# Altium PCB nexnclock_one_mainboard_rev_2_0.PcbDoc
Units mm, origin at the board's own origin, x right, y up, seen from the top; angles counter-clockwise.
Board outline 100 x 35 mm, 2 copper layers (Top Layer, Bottom Layer), stack 1.571 mm thick; 122 components, 112 nets, 401 pads, 144 vias.
Unrouted connection lines stored in the file: 125.
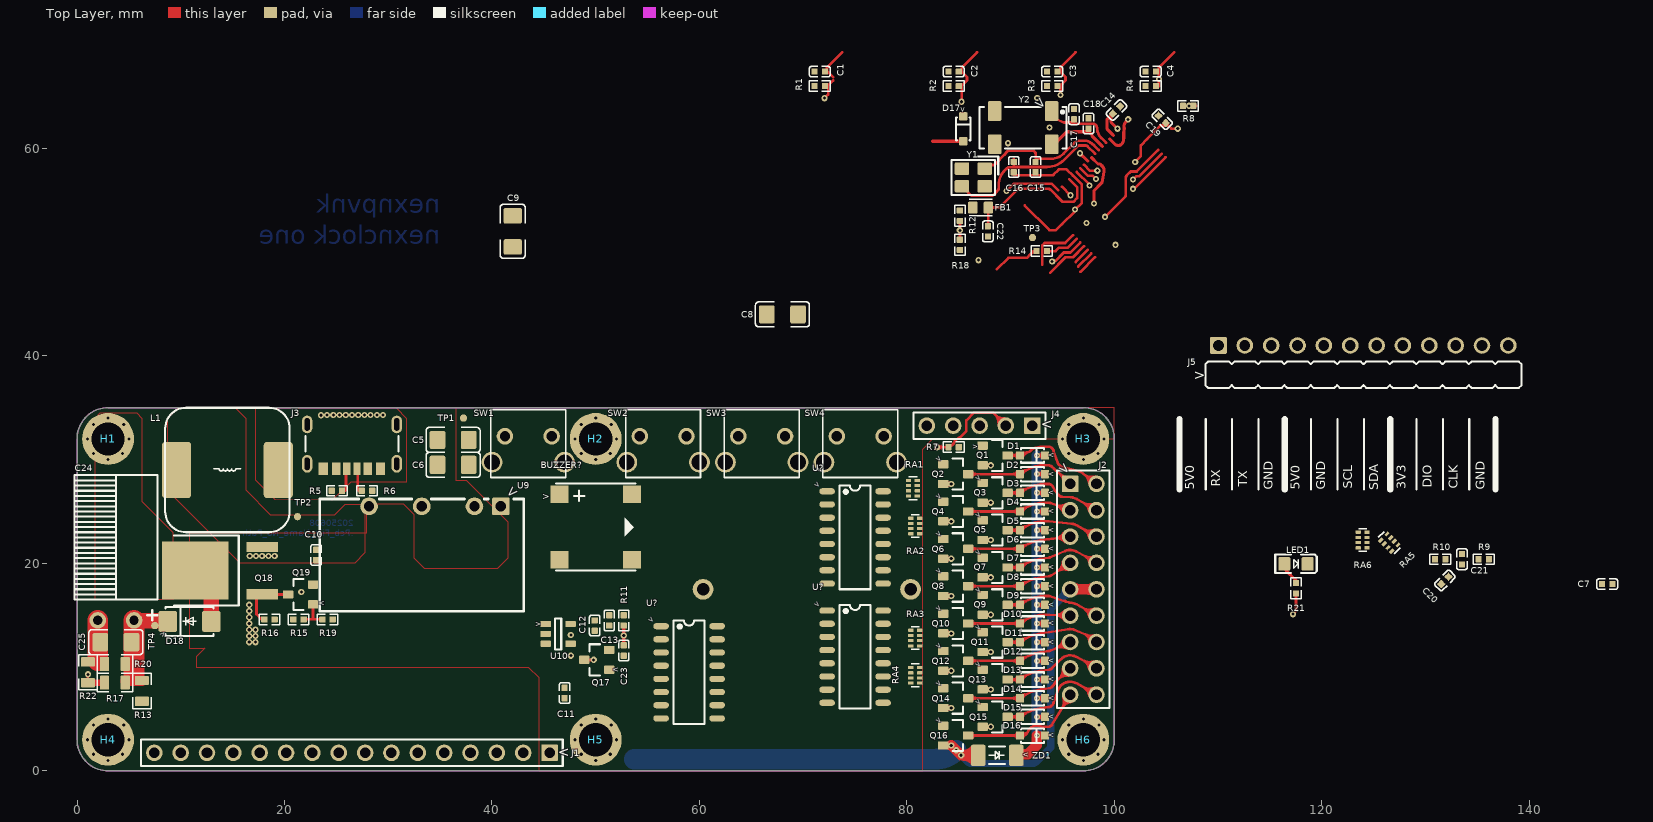
[diagram p0: Top Layer view]
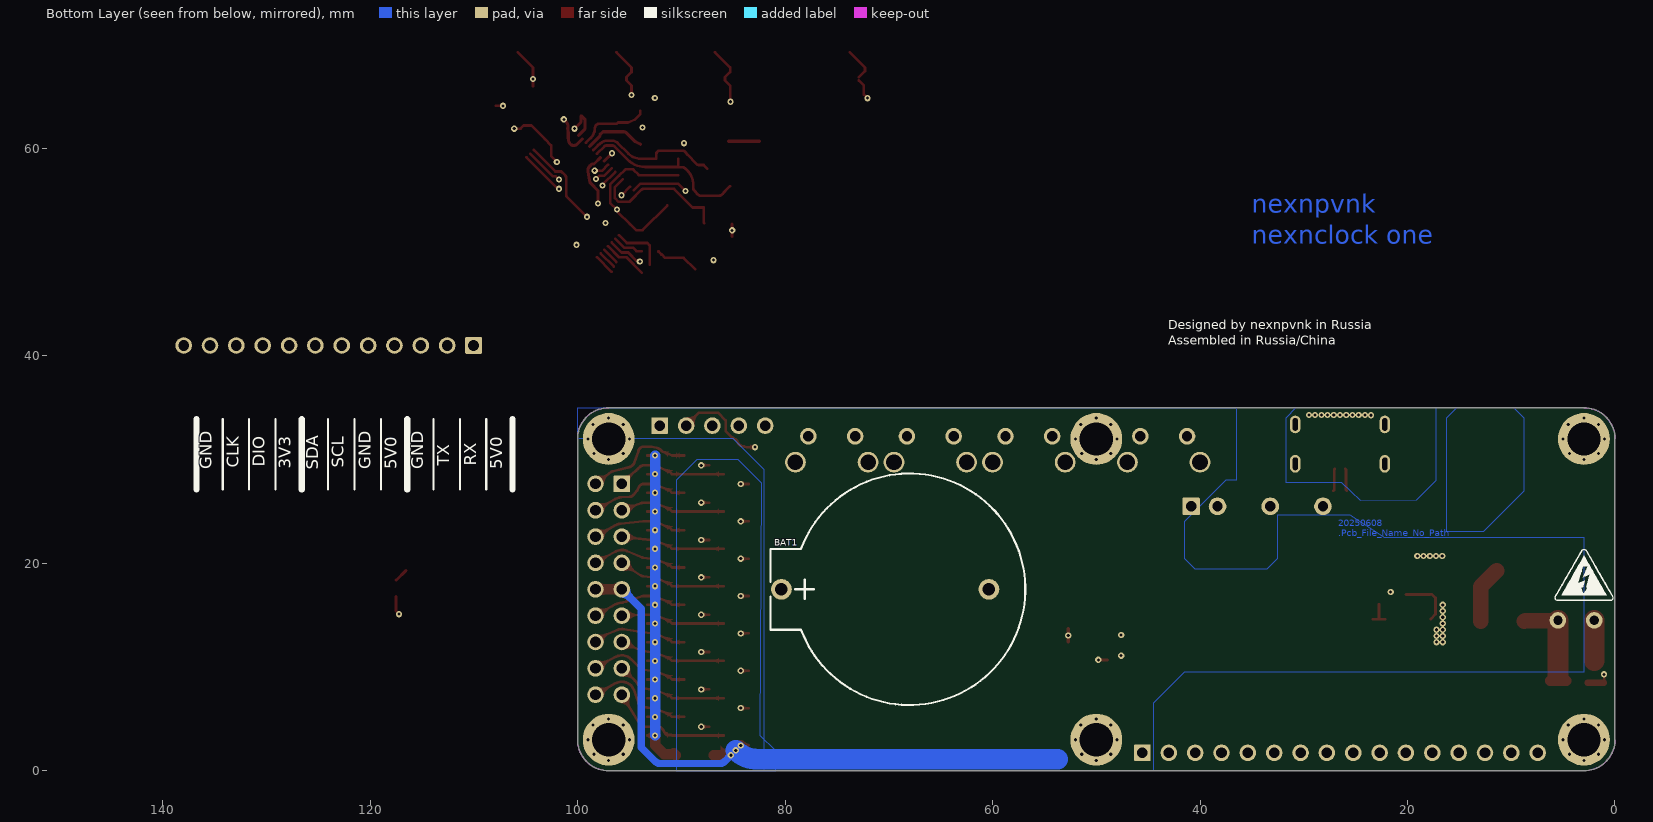
[diagram p1: Bottom Layer view, seen from below]

## Layer stack, top to bottom
Top Solder: solder mask 0.0102, Solder Resist, Dk 3.5
Top Layer: signal copper 0.0356
Dielectric 1: dielectric 1.5, FR-4, Dk 4.8
Bottom Layer: signal copper 0.0356
Bottom Solder: solder mask 0.0102, Solder Resist, Dk 3.5

## Board outline
0,3 0,32 cw(c3,32) 3,35 97,35 cw(c97,32) 100,32 100,3 cw(c97,3) 97,0 3,0 cw(c3,3)

## Design rules (kind name [scope] priority, off if disabled: settings)
Clearance [All] p1: gap=0.2 ignorepadtopadclearanceinfootprint=TRUE except(0: Arc-Text Track-Text SMDPad-Text THPad-Text Via-Text Fill-Text Poly-Text Region-Text Text-Text; 0.127: THPad-THPad; 0.3: Arc-THPad Track-THPad SMDPad-THPad)
ComponentClearance ComponentClearance_1 [(Footprint = 'B_S-2WR2_FLAT')] p1: gap=-5 collisioncheckmode=3 verticalgap=-5 showdistances=FALSE
ComponentClearance [All] p2: gap=0 collisioncheckmode=3 verticalgap=0 showdistances=FALSE
DiffPairsRouting [All] p1: maxlimit=1 minlimit=0.127 mostfreqgap=0.3 toplayer_minwidth=0.127 toplayer_maxwidth=0.381 toplayer_prefwidth=0.3 bottomlayer_minwidth=0.127 bottomlayer_maxwidth=0.381 bottomlayer_prefwidth=0.3 maxuncoupledlength=12.7
Height [All] p1: minheight=0 maxheight=100 prefheight=12.7
HoleSize [All] p1: absolutevalues=TRUE maxlimit=5 minlimit=0.025 maxpercent=80.000 minpercent=20.000
HoleToHoleClearance [All] p1: gap=0.127 allowstackedmicrovias=TRUE
MinimumSolderMaskSliver [All] p1: minsoldermaskwidth=0.05
PolygonConnect PolygonConnect_1 [All] p1: thpad.connectstyle=Relief thpad.reliefconductorwidth=0.254 thpad.reliefentries=4 thpad.polygonreliefangle="90 Angle" thpad.airgapwidth=0.2 smdpad.connectstyle=Relief smdpad.reliefconductorwidth=0.254 smdpad.reliefentries=4 smdpad.polygonreliefangle="90 Angle" smdpad.airgapwidth=0.2 via.connectstyle=Direct via.reliefconductorwidth=0.254 via.reliefentries=4 via.polygonreliefangle="90 Angle" via.airgapwidth=0.254
RoutingVias [All] p1: holewidth=0.3 width=0.6 viastyle="Through Hole" minholewidth=0.1 minwidth=0.3 maxholewidth=1 maxwidth=1.27
SilkToSilkClearance [All] p1: silktosilkclearance=0
SilkToSolderMaskClearance [IsPad] p1: minsilkscreentomaskgap=0.127 clearancetoexposedcopper=TRUE
SolderMaskExpansion [All] p1: expansion=0.05 istentingtop=FALSE
SupplyNets "Schematic Supply Nets_6" [InNet('VCC_3V3')] p1: voltage=0.000
SupplyNets "Schematic Supply Nets_5" [InNet('VBUS')] p2: voltage=0.000
SupplyNets "Schematic Supply Nets_4" [InNet('RAW_GND')] p3: voltage=0.000
SupplyNets "Schematic Supply Nets_3" [InNet('VCC_HV')] p4: voltage=0.000
SupplyNets "Schematic Supply Nets_1" [InNet('VCC_5V0')] p5: voltage=0.000
SupplyNets "Schematic Supply Nets" [InNet('GND')] p6: voltage=0.000
Width [All] p1: maxlimit=6 minlimit=0.2 preferedwidth=0.3
22 further rules are at their usual default settings.

## Classes and differential pairs
component class hot_handle_part: D1 D2 D3 D4 D5 D6 D7 D8 D9 D10 D11 D12 D13 D14 D15 D16 J1 J2 Q1 Q2 Q3 Q4 Q5 Q6 Q7 Q8 Q9 Q10 Q11 Q12 Q13 Q14 Q15 Q16 RA1 RA2 RA3 RA4 RA5 RA6 U? ZD1
component class nexnclock_one_mainboard_rev_2_0: BAT1 BUZZER? C1 C2 C3 C4 C5 C6 C7 C8 C9 C10 C11 C12 C13 C14 C15 C16 C17 C18 C19 C20 C21 C22 C23 C24 C25 D17 D18 FB1 H1 H2 H3 H4 H5 H6 J3 J4 J5 L1 LED1 Q17 Q18 Q19 R1 R2 R3 R4 R5 R6 R7 R8 R9 R10 R11 R12 R13 R14 R15 R16 R17 R18 R19 R20 R21 R22 SW1 SW2 SW3 SW4 TP1 TP2 TP3 TP4 U9 U10 Y1 Y2

## Components (designator, comment, footprint, x,y, rotation, side; value= is the part's Value field where it differs from the comment)
BAT1 "BATTERY" CR2032 68,17.5 r0 bottom locked
BUZZER? "BUZZER_SMD" BUZ-SMD_4P-L7.5-W7.5 50,23.5 r0 top
C1 "CAP" C0402 71.6,67.4 r180 top value=100nF
C2 "CAP" C0402 84.5,67.4 r180 top value=100nF
C3 "CAP" C0402 94,67.4 r180 top value=100nF
C4 "CAP" C0402 103.5,67.4 r180 top value=100nF
C5 "CAP" C1206 36.25,31.9 r180 top value=10uF
C6 "CAP" C1206 36.25,29.5 r180 top value=10uF
C7 "CAP" C0402 147.5,18 r180 top value=100nF
C8 "CAP" C1206 68,44 r0 top value=10uF
C9 "CAP" C1206 42,52 r270 top value=10uF
C10 "CAP" C0402 23.05,20.8 r270 top value=100nF
C11 "CAP" C0402 47,7.5 r270 top value=1uF
C12 "CAP" C0402 49.9,14 r270 top value=1uF
C13 "CAP" C0402 51.3,14.5 r270 top value=100nF
C14 "CAP" C0402 100.2,63.7 r45 top value=100nF
C15 "CAP" C0402 92.4,58.2 r270 top value=22pF
C16 "CAP" C0402 90.3,58.2 r270 top value=22pF
C17 "CAP" C0402 96.1,63.3 r90 top value=22pF
C18 "CAP" C0402 97.5,62.4 r90 top value=22pF
C19 "CAP" C0402 104.6,62.8 r315 top value=100nF
C20 "CAP" C0402 131.854,18.354 r225 top value=100nF
C21 "CAP" C0402 133.5,20.4 r90 top value=100nF
C22 "CAP" C0402 87.8,52 r270 top value=100nF
C23 "CAP" C0402 52.7,11.6 r270 top value=100nF
C24 "CAP_POLAR" CAP-TH_D8.0_L12.0_P3.5_RA_FLAT 3.75,14.5 r180 top value=_value
C25 "CAP" C1206 3.75,12.4 r180 top value=100nF
D1 "DIODE" "SOD323 (SC-76A)" 92.1,30.4 r180 top
D2 "DIODE" "SOD323 (SC-76A)" 92.1,28.6 r180 top
D3 "DIODE" "SOD323 (SC-76A)" 92.1,26.8 r180 top
D4 "DIODE" "SOD323 (SC-76A)" 92.1,25 r180 top
D5 "DIODE" "SOD323 (SC-76A)" 92.1,23.2 r180 top
D6 "DIODE" "SOD323 (SC-76A)" 92.1,21.4 r180 top
D7 "DIODE" "SOD323 (SC-76A)" 92.1,19.6 r180 top
D8 "DIODE" "SOD323 (SC-76A)" 92.1,17.8 r180 top
D9 "DIODE" "SOD323 (SC-76A)" 92.1,16 r180 top
D10 "DIODE" "SOD323 (SC-76A)" 92.1,14.2 r180 top
D11 "DIODE" "SOD323 (SC-76A)" 92.1,12.4 r180 top
D12 "DIODE" "SOD323 (SC-76A)" 92.1,10.6 r180 top
D13 "DIODE" "SOD323 (SC-76A)" 92.1,8.8 r180 top
D14 "DIODE" "SOD323 (SC-76A)" 92.1,7 r180 top
D15 "DIODE" "SOD323 (SC-76A)" 92.1,5.2 r180 top
D16 "DIODE" "SOD323 (SC-76A)" 92.1,3.4 r180 top
D17 "DIODE" "SOD323 (SC-76A)" 85.429,61.884 r270 top
D18 "DIODE" "SMA (DO-214AC)" 10.85,14.4 r0 top
FB1 "BEAD" L0603 87.1,54.3 r0 top value=600Ω@100MHz
H1 "MOUNT_HOLE" MOUNT_HOLE_D_3_2_MM 3,32 r0 top
H2 "MOUNT_HOLE" MOUNT_HOLE_D_3_2_MM 50,32 r0 top
H3 "MOUNT_HOLE" MOUNT_HOLE_D_3_2_MM 97,32 r0 top locked
H4 "MOUNT_HOLE" MOUNT_HOLE_D_3_2_MM 3,3 r0 top
H5 "MOUNT_HOLE" MOUNT_HOLE_D_3_2_MM 50,3 r0 top
H6 "MOUNT_HOLE" MOUNT_HOLE_D_3_2_MM 97,3 r0 top locked
J1 "F_HEADER_1X16" F_HEADER_STRAIGHT_2_54_1X16 26.5,1.73 r180 top
J2 "F_HEADER_2X9" F_HEADER_STRAIGHT_2_54_2X9 97,17.5 r270 top locked
J3 "USB_TYPE_C_FEMALE_POWER_6_PIN" USB_TYPE_C_SMD_FEMALE_POWER_6_PIN 26.5,31.25 r90 top
J4 "F_HEADER_1X5" F_HEADER_STRAIGHT_2_54_1X5 87,33.27 r180 top locked
J5 "P_HEADER_1X12" P_HEADER_RIGHT_ANGLE_2_54_1X12 124,41 r0 top
L1 "POWER_INDUCTOR" CD127 14.5,29 r180 top value=220uH
LED1 "LED" LED0805 117.5,19.95 r0 top
Q1 "NPN" "SOT23-3 (TO-236)" 88.5,30.4 r0 top
Q2 "NPN" "SOT23-3 (TO-236)" 84.7,28.6 r0 top
Q3 "NPN" "SOT23-3 (TO-236)" 88.5,26.8 r0 top
Q4 "NPN" "SOT23-3 (TO-236)" 84.7,25 r0 top
Q5 "NPN" "SOT23-3 (TO-236)" 88.5,23.2 r0 top
Q6 "NPN" "SOT23-3 (TO-236)" 84.7,21.4 r0 top
Q7 "NPN" "SOT23-3 (TO-236)" 88.5,19.6 r0 top
Q8 "NPN" "SOT23-3 (TO-236)" 84.7,17.8 r0 top
Q9 "NPN" "SOT23-3 (TO-236)" 88.5,16 r0 top
Q10 "NPN" "SOT23-3 (TO-236)" 84.7,14.2 r0 top
Q11 "NPN" "SOT23-3 (TO-236)" 88.5,12.4 r0 top
Q12 "NPN" "SOT23-3 (TO-236)" 84.7,10.6 r0 top
Q13 "NPN" "SOT23-3 (TO-236)" 88.5,8.8 r0 top
Q14 "NPN" "SOT23-3 (TO-236)" 84.7,7 r0 top
Q15 "NPN" "SOT23-3 (TO-236)" 88.5,5.2 r0 top
Q16 "NPN" "SOT23-3 (TO-236)" 84.7,3.4 r0 top
Q17 "NPN" "SOT23-3 (TO-236)" 50.1,10.7 r180 top
Q18 "MOSFET N" "DPAK (TO-252-3)" 13.75,19.3 r90 top
Q19 "NPN" "SOT23-3 (TO-236)" 21.55,17 r180 top
R1 "RESISTOR" R0402 71.6,66 r0 top value=5.1k
R2 "RESISTOR" R0402 84.5,66 r0 top value=5.1k
R3 "RESISTOR" R0402 94,66 r0 top value=5.1k
R4 "RESISTOR" R0402 103.5,66 r0 top value=5.1k
R5 "RESISTOR" R0402 25.05,27 r180 top value=5.1k
R6 "RESISTOR" R0402 27.95,27 r0 top value=5.1k
R7 "RESISTOR" R0402 84.5,31.2 r180 top value=330R
R8 "RESISTOR" R0402 107.1,64.1 r0 top value=5.1k
R9 "RESISTOR" R0402 135.6,20.4 r0 top value=5.1k
R10 "RESISTOR" R0402 131.4,20.4 r180 top value=5.1k
R11 "RESISTOR" R0402 52.7,14.5 r270 top value=5.1k
R12 "RESISTOR" R0402 85.1,53.5 r270 top value=5.1k
R13 "RESISTOR" R0805 6.25,7.7 r270 top value=10k
R14 "RESISTOR" R0402 93,50.1 r180 top value=330R
R15 "RESISTOR" R0402 21.35,14.6 r0 top value=5.1k
R16 "RESISTOR" R0402 18.55,14.6 r180 top value=330R
R17 "RESISTOR" R0805 3.65,8.5 r180 top value=1M
R18 "RESISTOR" R0402 85.1,50.7 r270 top value=5.1k
R19 "RESISTOR" R0402 24.15,14.6 r180 top value=330R
R20 "RESISTOR" R0805 3.65,10.3 r180 top value=300k
R21 "RESISTOR" R0402 117.5,17.6 r90 top value=330R
R22 "RESISTOR" R0805 1.05,9.5 r90 top value=10k
RA1 "RESISTOR_ARRAY_X4" RA0402X4_CONVEX 80.573,27.25 r90 top value=1k
RA2 "RESISTOR_ARRAY_X4" RA0402X4_CONVEX 80.8,23.6 r90 top value=1k
RA3 "RESISTOR_ARRAY_X4" RA0402X4_CONVEX 80.8,12.8 r90 top value=1k
RA4 "RESISTOR_ARRAY_X4" RA0402X4_CONVEX 80.8,9.2 r90 top value=1k
RA5 "RESISTOR_ARRAY_X4" RA0402X4_CONVEX 126.5,22 r315 top value=1k
RA6 "RESISTOR_ARRAY_X4" RA0402X4_CONVEX 123.927,22.25 r270 top value=1k
SW1 "TACTILE_SWITCH" KLS7-TS6606 43.5,31 r90 top
SW2 "TACTILE_SWITCH" KLS7-TS6606 56.5,31 r90 top
SW3 "TACTILE_SWITCH" KLS7-TS6606 66,31 r90 top
SW4 "TACTILE_SWITCH" KLS7-TS6606 75.5,31 r90 top
TP1 "TEST_POINT" TEST_POINT_D_0_7 37.25,34 r0 top
TP2 "TEST_POINT" TEST_POINT_D_0_7 21.25,24.5 r0 top
TP3 "TEST_POINT" TEST_POINT_D_0_7 92.1,51.4 r0 top
TP4 "TEST_POINT" TEST_POINT_D_0_7 7.5,14 r0 top
U9 "B_S-2WR2" B_S-2WR2_FLAT 34.5,25.5 r180 top
U10 "RT9193" SOT23-5 46.375,13.2 r0 top
U? "595" SOIC16_150MIL 59,9.5 r0 top
U? "595" SOIC16_150MIL 75,22.5 r0 top
U? "595" SOIC16_150MIL 75,11 r0 top
Y1 "CRYSTAL_4P" SMD3225_4P 86.4,57.2 r180 top
Y2 "CRYSTAL_32768_HZ" MC-306 91.2,62 r180 top
ZD1 "DIODE_ZENER" "SOD80 (MiniMELF)" 88.7,1.5 r180 top

## Footprints (in the part's own frame and the unit in brackets; to place one, negate y for a bottom-side part, rotate by r counter-clockwise, add the part's x,y. Pads: shape width x height; smd on the part's side, far side on the other; paste and mask are expansions set on the pad)
B_S-2WR2_FLAT [mm]
  rrect20% 1.7x1.7 hole 1 mask+0.05: 1(-6.35,0)
  round 1.7 hole 1 mask+0.05: 2(-3.81,0) 4(1.27,0) 6(6.35,0)
  silkscreen extent -8.56,-0.7 11.1,10.1, body extent -8.53,-4.1 11.07,10.1, height 7.1
BUZ-SMD_4P-L7.5-W7.5 [mm]
  rect 1.7x1.7 smd mask+0.05: 1(-3.497,3.15) 2(-3.497,-3.15) 3(3.497,-3.15) 4(3.497,3.15)
  silkscreen extent -3.81,-4.19 3.84,4.19, body extent -4.25,-4.15 4.3,4.35, height 3.2
C0402 [mm]
  rrect20% 0.6x0.6 smd mask+0.05: 1(-0.5,0) 2(0.5,0)
  silkscreen extent -1,-0.5 1,0.5, body extent -0.5,-0.25 0.5,0.25, height 0.52
C1206 [mm]
  rrect20% 1.5x1.75 smd mask+0.05: 1(-1.5,0) 2(1.5,0)
  silkscreen extent -2.6,-1.2 2.6,1.2, body extent -1.6,-0.8 1.6,0.8, height 1.62
CAP-TH_D8.0_L12.0_P3.5_RA_FLAT [mm]
  round 1.6 hole 0.9 mask+0.05: 1(-1.75,0) 2(1.75,0)
  silkscreen extent -4,-14 4,0, body extent -4,-14 4,0.25, height 8.1
CD127 [mm]
  rrect20% 2.8x5.4 smd mask+0.05: 1(-4.9,0) 2(4.9,0)
  silkscreen extent -6,-6 6,6, body extent -6,-6 6,6, height 7.46
CR2032 [mm] "KLS5-CR2032-01 (BH-642) (CH224-2032)"
  round 2 hole 1.2 mask+0.05: 1(12.35,0) 2(-7.65,0)
  silkscreen extent -11.16,-11.16 13.4,11.16, body extent -11.15,-11.15 13.15,11.15, height 8.5
"DPAK (TO-252-3)" [mm]
  rect 1x3 smd mask+0.05: 1(-2.28,-4.1) 2(2.28,-4.1)
  rect 5.6x6.4 smd mask+0.05: 3(0,2.35)
  silkscreen extent -3.38,-1.84 3.38,4.41, body extent -3.35,-4.57 3.35,5.34, height 2.39
F_HEADER_STRAIGHT_2_54_1X5 [mm]
  rrect10% 1.6x1.6 hole 1.02 paste-2539.97 mask+0.05: 1(-5.08,0)
  round 1.6 hole 1.02 paste-2539.97 mask+0.05: 2(-2.54,0) 3(0,0)
  round 1.6 hole 1.02 mask+0.05: 4(2.54,0) 5(5.08,0)
  silkscreen extent -6.35,-1.27 6.35,1.27, body extent -6.35,-1.27 6.35,1.27, height 8.5
F_HEADER_STRAIGHT_2_54_1X16 [mm]
  rrect10% 1.6x1.6 hole 1.02 paste-2539.97 mask+0.05: 1(-19.05,0)
  round 1.6 hole 1.02 paste-2539.97 mask+0.05: 2(-16.51,0) 3(-13.97,0)
  round 1.6 hole 1.02 mask+0.05: 4(-11.43,0) 5(-8.89,0) 6(-6.35,0) 7(-3.81,0) 8(-1.27,0) 9(1.27,0) 10(3.81,0) 11(6.35,0) 12(8.89,0) 13(11.43,0) 14(13.97,0) 15(16.51,0) 16(19.05,0)
  silkscreen extent -20.32,-1.27 20.32,1.27, body extent -20.32,-1.27 20.32,1.27, height 8.5
F_HEADER_STRAIGHT_2_54_2X9 [mm]
  rrect10% 1.6x1.6 hole 1.02 paste-2539.97 mask+0.05: 1(-10.16,-1.27)
  round 1.6 hole 1.02 paste-2539.97 mask+0.05: 2(-10.16,1.27) 3(-7.62,-1.27)
  round 1.6 hole 1.02 mask+0.05: 4(-7.62,1.27) 5(-5.08,-1.27) 6(-5.08,1.27) 7(-2.54,-1.27) 8(-2.54,1.27) 9(0,-1.27) 10(0,1.27) 11(2.54,-1.27) 12(2.54,1.27) 13(5.08,-1.27) 14(5.08,1.27) 15(7.62,-1.27) 16(7.62,1.27) 17(10.16,-1.27) 18(10.16,1.27)
  silkscreen extent -11.43,-2.54 11.43,2.54, body extent -11.43,-2.54 11.43,2.54, height 8.5
KLS7-TS6606 [mm]
  round 1.6 hole 1 mask+0.05: 1(1.25,-2.25) 2(1.25,2.25)
  round 2 hole 1.5 mask+0.05: 3(-1.25,3.5) 4(-1.25,-3.5)
  silkscreen extent -2.73,-3.6 3.83,3.6, body extent -2.75,-4.21 9.6,4.21, height 7.06
L0603 [mm]
  rrect20% 0.91x1.12 smd mask+0.05: 1(-0.75,0) 2(0.75,0)
  silkscreen extent -1.1,-0.8 1.1,0.8, body extent -0.8,-0.4 0.8,0.4, height 0.81
LED0805 [mm]
  rrect20% 1.15x1.3 smd paste+0 mask+0.05: 1(-1.125,0) 2(1.125,0)
  silkscreen extent -2,-0.9 2,0.9, body extent -1.8,-0.77 1.8,0.77, height 0.25
MC-306 [mm]
  rrect20% 1.3x1.9 smd paste+0 mask+0.05: 1(-2.75,-1.6) 2(2.75,-1.6) 3(2.75,1.6) 4(-2.75,1.6)
  silkscreen extent -4.2,-2 4.2,2, body extent -4.3,-2.65 4.3,2.65, height 0.25
MOUNT_HOLE_D_3_2_MM [mm]
  round 5 hole 3.2 mask+0.05: 1(0,0)
P_HEADER_RIGHT_ANGLE_2_54_1X12 [mm]
  rrect10% 1.6x1.6 hole 1.02 paste-2539.97 mask+0.05: 1(-13.97,0)
  round 1.6 hole 1.02 paste-2539.97 mask+0.05: 2(-11.43,0) 3(-8.89,0)
  round 1.6 hole 1.02 mask+0.05: 4(-6.35,0) 5(-3.81,0) 6(-1.27,0) 7(1.27,0) 8(3.81,0) 9(6.35,0) 10(8.89,0) 11(11.43,0) 12(13.97,0)
  silkscreen extent -15.23,-4.09 15.25,-1.55, body extent -15.24,-10.05 15.24,0.31, height 2.52
R0402 [mm]
  rrect20% 0.6x0.6 smd mask+0.05: 1(-0.5,0) 2(0.5,0)
  silkscreen extent -1,-0.5 1,0.5, body extent -0.5,-0.25 0.5,0.25, height 0.37
R0805 [mm]
  rrect20% 0.9x1.35 smd mask+0.05: 1(-1,0) 2(1,0)
  silkscreen extent -1.7,-0.9 1.7,0.9, body extent -1,-0.63 1,0.63, height 0.53
RA0402X4_CONVEX [mm]
  rrect20% 0.3x0.505 smd mask+0.05: 1(-0.75,0.427) 2(-0.25,0.427) 3(0.25,0.427) 4(0.75,0.427) 5(0.75,-0.427) 6(0.25,-0.427) 7(-0.25,-0.427) 8(-0.75,-0.427)
  silkscreen extent -1.1,-0.4 1.1,0.4, body extent -1,-0.5 1,0.5, height 0.45
"SMA (DO-214AC)" [mm]
  rrect20% 1.8x2 smd mask+0.05: 1(-2.1,0) 2(2.1,0)
  silkscreen extent -2.3,-1.4 2.3,1.4, body extent -2.6,-1.48 2.6,1.48, height 2.5
SMD3225_4P [mm]
  rrect20% 1.4x1.2 smd mask+0.05: 1(-1.1,-0.85) 2(1.1,-0.85) 3(1.1,0.85) 4(-1.1,0.85)
  silkscreen extent -2.4,-2 2.1,1.7, body extent -1.6,-1.25 1.6,1.25, height 0.65
"SOD80 (MiniMELF)" [mm] "SOD80 - MiniMELF - MMA - DO-213AA"
  rrect20% 1.4x2.03 smd mask+0.05: 1(-1.84,0) 2(1.84,0)
  silkscreen extent -0.77,-0.85 0.8,0.85, body extent -1.75,-0.85 1.75,0.85, height 1.7
"SOD323 (SC-76A)" [mm]
  rrect20% 0.8x0.8 smd mask+0.05: 1(-1.2,0) 2(1.2,0)
  silkscreen extent -1.1,-0.7 1.1,0.7, body extent -1.35,-0.72 1.35,0.72, height 1.15
SOIC16_150MIL [mm]
  oval 1.5x0.6 smd mask+0.05: 1(-2.7,4.445) 2(-2.7,3.175) 3(-2.7,1.905) 4(-2.7,0.635) 5(-2.7,-0.635) 6(-2.7,-1.905) 7(-2.7,-3.175) 8(-2.7,-4.445) 9(2.7,-4.445) 10(2.7,-3.175) 11(2.7,-1.905) 12(2.7,-0.635) 13(2.7,0.635) 14(2.7,1.905) 15(2.7,3.175) 16(2.7,4.445)
  silkscreen extent -1.5,-5 1.5,5, body extent -3,-4.95 3,4.95, height 1.75
"SOT23-3 (TO-236)" [mm]
  rrect20% 1x0.8 smd mask+0.05: 1(-1.2,0.95) 2(-1.2,-0.95) 3(1.2,0)
  silkscreen extent -0.3,-1.5 0.7,1.5, body extent -1.32,-1.5 1.32,1.5, height 1.1
SOT23-5 [mm]
  rrect20% 1x0.6 smd mask+0.05: 1(-1.2,0.95) 2(-1.2,0) 3(-1.2,-0.95) 4(1.2,-0.95) 5(1.2,0.95)
  silkscreen extent -0.3,-1.5 0.3,1.5, body extent -1.32,-1.5 1.32,1.5, height 1.3
TEST_POINT_D_0_7 [mm]
  round 0.7 smd mask+0.05: 1(0,0)
USB_TYPE_C_SMD_FEMALE_POWER_6_PIN [mm]
  rect 1.2x0.9 smd mask+0.05: 1(-2.14,2.75) 6(-2.14,-2.75)
  rect 1.2x0.8 smd mask+0.05: 2(-2.14,1.52) 5(-2.14,-1.52)
  rect 1.2x0.7 smd mask+0.05: 3(-2.14,0.5) 4(-2.14,-0.5)
  oval 1.7x1 hole 0.5 slot 1.2 at 0 deg mask+0.05: 7(-1.66,-4.32) 8(2.14,-4.32) 9(-1.66,4.32) 10(2.14,4.32)
  silkscreen extent -0.46,-4.47 1.02,4.47, body extent -2.13,-4.47 4.74,4.47, height 3.4

## Part data
BAT1 BUZZER? D1 D2 D3 D4 D5 D6 D7 D8 D9 D10 D11 D12 D13 D14 D15 D16 D17 D18 H1 H2 H3 H4 H5 H6 J1 J2 J3 J4 J5 LED1 Q1 Q2 Q3 Q4 Q5 Q6 Q7 Q8 Q9 Q10 Q11 Q12 Q13 Q14 Q15 Q16 Q17 Q18 Q19 SW1 SW2 SW3 SW4 TP1 TP2 TP3 TP4 U10 U? U? U? Y1 Y2: Manufacturer=_manufacturer
  BAT1: Part Reference=_part, PCB Footprint=CR2032, Procurement Type=DNP
  BUZZER?: Part Reference=_part, PCB Footprint=BUZ-SMD_4P-L7.5-W7.5
  D1 D2 D3 D4 D5 D6 D7 D8 D9 D10 D11 D12 D13 D14 D15 D16 D17: Part Reference=1N4007WS, PCB Footprint="SOD323 (SC-76A)"
  D18: Part Reference=ES1J, PCB Footprint="SMA (DO-214AC)"
  H1 H2 H3 H4 H5 H6: PCB Footprint=MOUNT_HOLE_D_3_2_MM, Procurement Type=DNP
  J1: Part Reference=_part, PCB Footprint=F_HEADER_STRAIGHT_2_54_1X16
  J2: Part Reference=_part, PCB Footprint=F_HEADER_STRAIGHT_2_54_2X9
  J3: Part Reference=_part, PCB Footprint=USB_TYPE_C_SMD_FEMALE_POWER_6_PIN
  J4: Part Reference=_part, PCB Footprint=F_HEADER_STRAIGHT_2_54_1X5
  J5: Part Reference=_part, PCB Footprint=P_HEADER_RIGHT_ANGLE_2_54_1X12
  LED1: Part Reference=_part, PCB Footprint=LED0805
  Q1 Q2 Q3 Q4 Q5 Q6 Q7 Q8 Q9 Q10 Q11 Q12 Q13 Q14 Q15 Q16 Q17 Q19: Part Reference=MMBTA42LT1, PCB Footprint="SOT23-3 (TO-236)"
  Q18: Part Reference=_part, PCB Footprint="DPAK (TO-252-3)"
  SW1 SW2 SW3 SW4: Part Reference=_part, PCB Footprint=KLS7-TS6606
  TP1 TP2 TP3 TP4: Part Reference=_part, PCB Footprint=TEST_POINT_D_0_7
  U10: Part Reference=_part, PCB Footprint=SOT23-5
  U? U? U?: Part Reference=_part, PCB Footprint=SOIC16_150MIL
  Y1: Part Reference=_part, PCB Footprint=SMD3225_4P
  Y2: Part Reference=_part, PCB Footprint=MC-306
C1 C2 C3 C4 C7 C10 C13 C14 C19 C20 C21 C22 C23: Dielectric=X7R, Manufacturer=YAGEO, Voltage=50V, Part Reference=CC0603KRX7R9BB104, PCB Footprint=C0402
C5 C6 C8 C9: Dielectric=X5R, Manufacturer=_manufacturer, Voltage=16V, Part Reference=FCC1206X106K160HT, PCB Footprint=C1206
C11 C12: Dielectric=X5R, Manufacturer=FOJAN, Voltage=16V, Part Reference=FCC0603X105K160CT, PCB Footprint=C0402
C15 C16 C17 C18: Dielectric=C0G, Manufacturer=_manufacturer, Voltage=50V, Part Reference=FCC0603N220J500CT, PCB Footprint=C0402
C24: Dielectric=_dielectric, Manufacturer=_manufacturer, Voltage=_voltage, Part Reference=_part, PCB Footprint=CAP-TH_D8.0_L12.0_P3.5_RA_FLAT
C25: Dielectric=X5R, Manufacturer=_manufacturer, Voltage=10V, Part Reference=_part, PCB Footprint=C1206
FB1: Current=1A, Manufacturer="FH (Guangdong Fenghua Advanced Tech)", Tolerancy=±25%, Part Reference=CBW160808U601T, PCB Footprint=L0603
L1: Current=1.6A, Manufacturer=_manufacturer, Tolerancy=_tolerancy, Part Reference=_part, PCB Footprint=CD127
R1 R2 R3 R4 R5 R6 R8 R9 R10 R11 R12 R15 R18 RA1 RA2 RA3 RA4 RA5 RA6: Manufacturer=YAGEO, Tolerancy=5%
  R1 R2 R3 R4 R5 R6 R8 R9 R10 R11 R12 R15 R18: Part Reference=RC0603JR-075K1L, PCB Footprint=R0402
  RA1 RA2 RA3 RA4 RA5 RA6: Part Reference=YC164-JR-07100RL, PCB Footprint=RA0402X4_CONVEX
R7 R13 R14 R16 R17 R19 R20 R21 R22: Manufacturer=_manufacturer, Tolerancy=5%, Part Reference=_part
  R7 R14 R16 R19 R21: PCB Footprint=R0402
  R13 R17 R20 R22: PCB Footprint=R0805
U9: Manufacturer=EVISUN, Part Reference=B0505S-3WR2, PCB Footprint=B_S-2WR2_FLAT
ZD1: Manufacturer=_manufacturer, Voltage=_voltage, Part Reference=_part, PCB Footprint="SOD80 (MiniMELF)"

## Via types
v1: diameter 0.6, hole 0.3, Top Layer to Bottom Layer, tented both sides, 96 vias
v2: diameter 0.6, hole 0.3, Top Layer to Bottom Layer, tented bottom, 48 vias

## Nets (pads, with @x,y where several pads share a name; then routed paths per layer and width w, separated by ;. In a path a pad name is that pad's centre, name@x,y a point inside that pad or via, vN(x,y) a via of type N, cw(c..) or ccw(c..) an arc to the next point about the centre after c; other vN are vias at no path point)
A0: RA5.4
A1: RA5.3
A2: RA5.2
A3: RA5.1
A4: RA6.4
A5: RA6.3
A6: RA6.2
A7: RA6.1
ADC_IN1: J4.5 R8.2 | length 1.9
  Top Layer w0.254: 94.949,56.303 94.951,56.303 v1@95.773,55.481 ; v1(107.2,64.1) 107.9,64.1
  other v1: 95.774,55.481
ADC_IN2: R17.2 R22.1 | length 8
  Top Layer w0.254: R22.1 v1(1.05,9.3) ; v1(89.6,55.9) 90.3,56.6 93.947,56.6 94.597,55.95
  Top Layer w0.6: R22.1 R17.2
AL_DATA2: J4.2 R7.2 | length 9.1
  Top Layer w0.254: v1(82.9,31.2) 83.7,31.2 83.95,31.267 84.21,31.337 ccw(c84.093,31.771) 84.411,31.453 84.453,31.496 ccw(c84.134,31.813) 84.566,31.688 cw(c84.98,31.57) 84.773,31.947 ; 84.773,31.947 85.009,32.077 ccw(c84.792,32.471) 85.111,32.153 85.73,32.772 85.73,33.768 86.482,34.52 88.29,34.52 J4.2
BOOT0: R12.2 R18.1 | length 10.1
  Top Layer w0.254: v1(99.1,53.4) 101.026,55.326 ccw(c100.846,55.505) 101.049,55.353 ccw(c100.846,55.505) 101.1,55.505 101.1,57.195 cw(c101.354,57.195) 101.151,57.347 cw(c101.354,57.195) 101.174,57.374 101.573,57.773 102.148,57.773 104.214,59.839
  Top Layer w0.3: 85.1,51.5 v1(85.1,52.1) 85.1,52.7
C0: Q1.1 RA1.4
C1: Q2.1 RA1.3
C2: Q3.1 RA1.2
C3: Q4.1 RA1.1
C4: Q5.1 RA2.4
C5: Q6.1 RA2.3
C6: Q7.1 RA2.2
C7: Q8.1 RA2.1
C8: Q9.1 RA3.4
C9: Q10.1 RA3.3
C10: Q11.1 RA3.2
C11: Q12.1 RA3.1
C12: Q13.1 RA4.4
C13: Q14.1 RA4.3
C14: Q15.1 RA4.2
C15: Q16.1 RA4.1
CENTER_BTN: C3.1 R3.2 SW3.1 | length 6.6
  Top Layer w0.254: v1(94.8,65.15) 94.8,66.05 95.288,66.538 95.288,66.862 94.8,67.35 94.8,67.8 96.25,69.25 ; 97.072,58.424 97.084,58.424 97.668,57.841 98.341,57.841 v1(98.35,57.85)
COLD_ANODE_0: RA5.5
COLD_ANODE_1: RA5.6
COLD_ANODE_2: RA5.7
COLD_ANODE_3: RA5.8 | length 2
  Top Layer w0.254: 96.718,48.1 98.133,49.515
COLD_ANODE_4: RA6.5 | length 1.8
  Top Layer w0.254: 96.508,48.598 97.779,49.868
COLD_ANODE_5: RA6.6 | length 1.7
  Top Layer w0.254: 96.255,49.052 97.426,50.222
COLD_ANODE_6: RA6.7 | length 4.3
  Top Layer w0.254: 93.797,48 95.302,49.506 96.002,49.506 97.072,50.576
COLD_ANODE_7: RA6.8 | length 5.2
  Top Layer w0.254: 93.05,48.8 93.05,50.65 93.277,50.877 94.289,50.877 94.56,50.877 95.252,50.877 96.011,51.636
COLD_CATHODE_0: RA1.5
COLD_CATHODE_1: RA1.6
COLD_CATHODE_2: RA1.7
COLD_CATHODE_3: RA1.8
COLD_CATHODE_4: RA2.5
COLD_CATHODE_5: RA2.6
COLD_CATHODE_6: RA2.7
COLD_CATHODE_7: RA2.8
COLD_CATHODE_8: RA3.5
COLD_CATHODE_9: RA3.6
COLD_CATHODE_10: RA3.7
COLD_CATHODE_11: RA3.8
COLD_CATHODE_12: RA4.5
COLD_CATHODE_13: RA4.6
COLD_CATHODE_14: RA4.7
COLD_CATHODE_15: RA4.8
CRYSTAL_IN: C15.1 Y1.1 | length 13.3
  Top Layer w0.254: Y1.1 87.853,58.403 88.334,58.403 ccw(c88.334,58.657) 88.513,58.477 89.427,59.39 ccw(c89.248,59.57) 89.469,59.445 89.53,59.554 cw(c89.913,59.338) 89.783,59.757 89.81,59.766 cw(c89.885,59.523) 89.885,59.777 92.118,59.777 cw(c92.118,59.523) 92.297,59.703 92.326,59.674 cw(c92.146,59.495) 92.4,59.495 92.4,59 92.773,59 93.9,59 ccw(c93.9,60.687) 94.43,59.085 94.613,59.146 ccw(c94.47,59.58) 94.754,59.222 95.066,59.47 ccw(c94.909,59.669) 95.087,59.488 96.132,60.521 cw(c96.633,60.021) 96.134,60.523 cw(c96.633,60.021) 96.206,60.586 cw(c96.481,60.224) 96.208,60.587 ; 96.208,60.587 cw(c96.633,60.021) 96.633,60.729 97.225,60.729 cw(c97.225,60.021) 97.656,60.583 98.027,60.298 98.486,59.839
CRYSTAL_OUT: C16.1 Y1.3 | length 16.8
  Top Layer w0.254: Y1.3 85.773,55.877 85.853,55.797 cw(c85.403,55.349) 85.931,55.702 ccw(c86.457,56.058) 86.456,55.423 87.206,55.423 88.08,55.423 ccw(c88.08,55.87) 88.412,55.571 88.773,55.972 ccw(c88.584,56.142) 88.775,55.974 ccw(c88.584,56.142) 88.838,56.141 88.838,56.439 cw(c90.91,56.439) 89.441,57.899 ; 89.442,57.9 cw(c89.621,57.72) 89.448,57.906 89.612,58.058 cw(c89.913,57.738) 89.903,58.177 90.052,58.18 ccw(c90.046,58.434) 90.068,58.181 90.278,58.199 cw(c90.3,57.946) 90.3,58.2 ; 90.3,59 90.3,58.2 ; 98.133,59.485 97.398,60.203 ccw(c97.22,60.021) 97.22,60.275 96.633,60.275 ccw(c96.633,60.021) 96.454,60.201 95.134,58.881 cw(c93.485,60.536) 93.5,58.2 90.3,58.2
CRYSTAL_RTC_IN: C17.1 Y2.1 | length 6.9
  Top Layer w0.254: Y2.1 93.95,63.302 94.47,62.782 95.052,62.522 ccw(c95.155,62.754) 95.155,62.5 96.1,62.5 96.223,62.377 97.888,62.377 cw(c97.888,61.938) 98.327,61.94 cw(c97.888,61.938) 98.327,61.938 ccw(c99.595,61.937) 98.696,61.043 98.734,61.005 99.193,60.546
CRYSTAL_RTC_OUT: C18.1 Y2.4 | length 6
  Top Layer w0.3: Y2.4 94.45,60.65 95.312,61.512 cw(c95.524,61.3) 95.524,61.6 97.5,61.6 97.55,61.6 97.85,61.3 97.85,61.182 98.84,60.192
EQUAL_CATHODE: D1.1 D2.1 D3.1 D4.1 D5.1 D6.1 D7.1 D8.1 D9.1 D10.1 D11.1 D12.1 D13.1 D14.1 D15.1 D16.1 ZD1.1 | length 43
  Top Layer w0.254: v1(92.525,3.4) D16.1 ; v1(92.525,5.2) D15.1 ; v1(92.525,7) D14.1 ; v1(92.525,8.8) D13.1 ; v1(92.525,10.6) D12.1 ; v1(92.525,12.4) D11.1 ; v1(92.525,14.2) D10.1 ; v1(92.525,16) D9.1 ; v1(92.525,17.8) D8.1 ; v1(92.525,19.6) D7.1 ; v1(92.525,21.4) D6.1 ; v1(92.525,23.2) D5.1 ; v1(92.525,25) D4.1 ; v1(92.525,26.8) D3.1 ; v1(92.525,28.6) D2.1 ; v1(92.525,30.4) D1.1
  Top Layer w1: ZD1.1@90.74,1.7 ZD1.1 90.64,1.6 91.646,1.6 92.525,2.479 v1(92.525,3.4)
  Bottom Layer w1: v1(92.525,3.4) v1(92.525,5.2) v1(92.525,7) v1(92.525,8.8) v1(92.525,10.6) v1(92.525,12.4) v1(92.525,14.2) v1(92.525,16) v1(92.525,19.6) v1(92.525,21.4) v1(92.525,23.2) v1(92.525,25) v1(92.525,26.8) v1(92.525,28.6) v1(92.525,30.4)
GND: BAT1.2 C1.2 C2.2 C3.2 C4.2 C8.2 C9.2 C10.2 C11.2 C12.2 C13.2 C14.2 C15.2 C16.2 C17.2 C18.2 C19.2 C20.2 C21.2 C22.2 C23.2 C24.2 C25.2 J2.9 J2.10 J4.1 J4.4 J5.4 J5.6 J5.12 LED1.2 Q1.2 Q2.2 Q3.2 Q4.2 Q5.2 Q6.2 Q7.2 Q8.2 Q9.2 Q10.2 Q11.2 Q12.2 Q13.2 Q14.2 Q15.2 Q16.2 Q17.2 Q18.2 Q19.2 R18.2 R20.2 R22.2 SW1.2 SW1.3 SW1.4 SW2.2 SW2.3 SW2.4 SW3.2 SW3.3 SW3.4 SW4.2 SW4.3 SW4.4 U9.4 U10.2 Y1.2 Y1.4 Y2.2 Y2.3 ZD1.2 | length 101.8
  Top Layer w0.254: Q16.2 v1(84.275,2.45) ; Q14.2 v1(84.275,6.05) ; Q12.2 v1(84.275,9.65) ; Q10.2 v1(84.275,13.25) ; Q8.2 v1(84.275,16.85) ; Q6.2 v1(84.275,20.45) ; Q4.2 v1(84.275,24.05) ; Q2.2 v1(84.275,27.65) ; Q15.2 v1(88.075,4.25) ; Q13.2 v1(88.075,7.85) ; Q11.2 v1(88.075,11.45) ; Q9.2 v1(88.075,15.05) ; Q7.2 v1(88.075,18.65) ; Q5.2 v1(88.075,22.25) ; Q3.2 v1(88.075,25.85) ; Q1.2 v1(88.075,29.45) ; 90.3,57.4 92.4,57.4 93.97,57.4 ccw(c93.97,57.654) 94.122,57.451 ccw(c93.97,57.654) 94.149,57.474 94.601,57.926 cw(c94.78,57.746) 94.628,57.949 cw(c94.78,57.746) 94.78,58 95.257,58 cw(c95.257,57.746) 95.435,57.928 96.011,57.364 ; 91.35,54.5 93.736,52.114 94.355,52.114 94.938,52.697 94.951,52.697 96.134,53.88 96.134,54.034 v1(96.2,54.1) 96.855,54.755 96.855,56.52 96.011,57.364 ; v1(102,58.7) 102.552,59.252 102.552,60.286 103.153,60.887 103.153,60.899 104.453,62.199 105.13,62.199 105.166,62.234 105.5,61.9 v1(106.1,61.9)
  Top Layer w1: v1(84.275,2.45) v1(85.225,1.5) ZD1.2 ; J2.9 J2.10
  Top Layer w2: 2,10.625 C24.2
  Bottom Layer w0.7: v1(85.225,1.5) 85.821,0.904 ccw(c86.315,1.4) 86.315,0.7 92.01,0.7 ccw(c92.01,1.4) 92.43,0.84 ccw(c92.01,1.4) 92.505,0.905 93.85,2.25 93.85,15.62 J2.9
  Bottom Layer w2: 53.708,1.117 82.649,1.117 ccw(c82.65,4.117) v1(84.75,1.975)
  other v1: 47.6,11.1 16.6,12.4 17.2,12.4 16.6,13 17.2,13 47.6,13.1 16.6,13.6 17.2,13.6 16.6,14.2 16.6,14.8 16.6,15.4 16.6,16 21.625,17.25 16.65,20.7 17.25,20.7 17.85,20.7 18.45,20.7 19.05,20.7 86.9,49.225 100.1,50.7 97.3,52.8 89.75,60.5 93.75,62 92.55,64.85
HIGHLIGHT_BTN: C1.1 R1.2 SW1.1 | length 7
  Top Layer w0.254: v1(72.04,64.84) 72.4,65.2 72.4,66 ; 72.4,66.05 72.888,66.538 ; 72.888,66.862 72.308,67.442 72.3,67.442 72.3,67.8 73.75,69.25 ; 96.365,57.717 97.585,56.497 v1(97.585,56.415)
HOT_ANODE_0: J1.2
HOT_ANODE_1: J1.4
HOT_ANODE_2: J1.6
HOT_ANODE_3: J1.8
HOT_ANODE_4: J1.10
HOT_ANODE_5: J1.12
HOT_ANODE_6: J1.14
HOT_ANODE_7: J1.16
HOT_CATHODE_0: D1.2 J2.2 Q1.3 | length 10.4
  Top Layer w0.254: Q1.3 D1.2 91.15,30.502 91.78,30.758 ccw(c91.608,31.174) 91.951,30.883 cw(c92.525,30.4) 92.373,31.134 92.87,31.239 cw(c92.98,30.72) 92.98,31.25 93.58,31.25 93.62,31.25 cw(c93.62,30.72) 94.122,30.889 94.527,29.689 ccw(c94.953,29.832) 94.645,29.505 94.646,29.504 94.76,29.398 ccw(c95.066,29.727) 94.957,29.291 96.576,28.895 cw(c96.45,28.38) 96.771,28.802 J2.2
HOT_CATHODE_1: D2.2 J2.1 Q2.3 | length 10.7
  Top Layer w0.254: Q2.3 D2.2 91.15,28.85 92.242,29.295 cw(c92.525,28.6) 92.371,29.334 92.871,29.439 cw(c92.98,28.92) 92.978,29.45 ; 92.978,29.45 93.62,29.45 cw(c93.62,28.92) 93.948,29.337 cw(c93.67,28.983) 93.949,29.335 cw(c93.62,28.92) 93.951,29.334 cw(c93.67,28.982) 93.957,29.329 cw(c93.62,28.92) 93.986,29.303 94.173,29.124 ccw(c94.899,29.884) 94.178,29.12 94.181,29.117 94.349,28.96 ccw(c95.066,29.727) 94.368,28.943 95.08,28.31 J2.1
HOT_CATHODE_2: D3.2 J2.4 Q3.3 | length 9.7
  Top Layer w0.254: Q3.3 D3.2 91.15,27.05 92.242,27.495 cw(c92.525,26.8) 92.371,27.534 92.871,27.639 cw(c92.98,27.12) 92.98,27.65 93.62,27.65 cw(c93.62,27.12) 94.112,27.318 94.183,27.14 ; 94.184,27.14 ccw(c94.601,27.309) 94.254,27.022 94.602,26.602 ccw(c95.01,26.94) 94.983,26.411 95.795,26.368 95.798,26.368 cw(c95.73,25.12) 96.343,26.209 96.348,26.206 J2.4
HOT_CATHODE_3: D4.2 J2.3 Q4.3 | length 10.2
  Top Layer w0.254: Q4.3 D4.2 91.15,25.25 92.242,25.695 cw(c92.525,25) 92.371,25.734 92.871,25.839 cw(c92.98,25.32) 92.978,25.85 ; 92.978,25.85 93.62,25.85 cw(c93.62,25.32) 93.8,25.818 J2.3
HOT_CATHODE_4: D5.2 J2.6 Q5.3 | length 9.1
  Top Layer w0.254: Q5.3 D5.2 91.15,23.45 92.242,23.895 cw(c92.525,23.2) 92.371,23.934 92.869,24.038 92.872,24.039 cw(c92.98,23.52) 92.98,24.05 93.62,24.05 cw(c93.62,23.52) 93.674,24.047 93.677,24.047 95.857,23.824 cw(c95.73,22.58) 96.035,23.792 cw(c95.926,23.356) 96.038,23.792 ; 96.038,23.792 96.04,23.791 cw(c95.73,22.58) 96.343,23.669 96.348,23.666 J2.6
HOT_CATHODE_5: D6.2 J2.5 Q6.3 | length 10.1
  Top Layer w0.254: Q6.3 D6.2 91.15,21.65 92.242,22.095 cw(c92.525,21.4) 92.371,22.134 92.869,22.238 92.872,22.239 cw(c92.98,21.72) 92.917,22.246 92.92,22.247 J2.5
HOT_CATHODE_6: D7.2 J2.8 Q7.3 | length 9.2
  Top Layer w0.254: Q7.3 D7.2 91.15,19.85 92.242,20.295 cw(c92.525,19.6) 92.371,20.334 92.869,20.438 92.872,20.439 cw(c92.98,19.92) 92.905,20.445 92.909,20.445 93.694,20.555 ccw(c93.62,21.08) 93.827,20.592 95.243,21.191 95.245,21.192 cw(c95.73,20.04) 96.313,21.146 96.318,21.143 97.24,20.656 cw(c97.029,20.258) 97.26,20.644 J2.8
HOT_CATHODE_7: D8.2 J2.7 Q8.3 | length 10.4
  Top Layer w0.254: Q8.3 D8.2 91.15,18.05 92.242,18.495 cw(c92.525,17.8) 92.371,18.534 92.871,18.639 cw(c92.98,18.12) 92.906,18.645 93.694,18.755 ccw(c93.62,19.28) 93.912,18.838 J2.7
HOT_CATHODE_8: D9.2 J2.12 Q9.3 | length 9.2
  Top Layer w0.254: Q9.3 D9.2 91.15,16.25 92.242,16.695 cw(c92.525,16) 92.371,16.734 92.871,16.839 cw(c92.98,16.32) 92.98,16.85 93.66,16.85 cw(c93.66,16.4) 93.801,16.827 95.195,16.368 cw(c95.053,15.941) 95.232,16.354 ccw(c95.73,17.5) 95.37,16.303 95.616,16.229 ccw(c95.745,16.66) 95.74,16.21 cw(c95.73,14.96) 96.348,16.047 96.638,15.883 J2.12
HOT_CATHODE_9: D10.2 J2.11 Q10.3 | length 10
  Top Layer w0.254: Q10.3 D10.2 91.15,14.45 92.242,14.895 cw(c92.525,14.2) 92.371,14.934 92.871,15.039 cw(c92.98,14.52) 92.978,15.05 ; 92.978,15.05 93.62,15.05 cw(c93.62,14.52) 93.643,15.05 J2.11
HOT_CATHODE_10: D11.2 J2.14 Q11.3 | length 9.1
  Top Layer w0.254: Q11.3 D11.2 91.15,12.65 92.242,13.095 cw(c92.525,12.4) 92.371,13.134 92.871,13.239 cw(c92.98,12.72) 92.906,13.245 93.694,13.355 ccw(c93.62,13.88) 93.705,13.357 95.525,13.653 95.532,13.654 cw(c95.73,12.42) 96.224,13.568 96.23,13.566 97.209,13.143 ; 97.21,13.142 cw(c97.031,12.73) 97.287,13.1 J2.14
HOT_CATHODE_11: D12.2 J2.13 Q12.3 | length 10.2
  Top Layer w0.254: Q12.3 D12.2 91.15,10.85 92.242,11.295 cw(c92.525,10.6) 92.371,11.334 92.871,11.439 cw(c92.98,10.92) 92.906,11.445 93.694,11.555 ccw(c93.62,12.08) 93.831,11.594 J2.13
HOT_CATHODE_12: D13.2 J2.16 Q13.3 | length 9.6
  Top Layer w0.254: Q13.3 D13.2 91.15,9.05 92.242,9.495 cw(c92.525,8.8) 92.371,9.534 92.871,9.639 cw(c92.98,9.12) 92.906,9.645 ; 92.906,9.645 93.694,9.755 ccw(c93.62,10.28) 93.996,9.907 94.84,10.758 94.844,10.762 cw(c95.73,9.88) 96.294,10.996 96.298,10.993 97.11,10.583 97.111,10.582 cw(c96.906,10.181) 97.14,10.566 J2.16
HOT_CATHODE_13: D14.2 J2.15 Q14.3 | length 10.8
  Top Layer w0.254: Q14.3 D14.2 91.15,7.25 92.242,7.695 cw(c92.525,7) 92.371,7.734 92.871,7.839 cw(c92.98,7.32) 92.906,7.845 93.694,7.955 ccw(c93.62,8.48) 93.999,8.109 94.055,8.167 ccw(c93.733,8.481) 94.123,8.257 cw(c95.73,7.34) 94.462,8.687 J2.15
HOT_CATHODE_14: D15.2 J2.18 Q15.3 | length 10.5
  Top Layer w0.254: Q15.3 90.05,5.2 90.65,5.2 D15.2 91.15,5.45 92.242,5.895 cw(c92.525,5.2) 92.371,5.934 92.871,6.039 cw(c92.98,5.52) 92.906,6.045 93.303,6.1 93.694,6.155 ccw(c93.62,6.68) 94.121,6.507 94.293,7.007 94.548,7.747 cw(c95.73,7.34) 96.049,8.549 ; 96.05,8.548 cw(c95.936,8.113) 96.053,8.548 96.057,8.546 cw(c95.73,7.34) 96.344,8.429 96.349,8.426 J2.18
HOT_CATHODE_15: D16.2 J2.17 Q16.3 | length 11.9
  Top Layer w0.254: Q16.3@85.9,3.4 D16.2 ; D16.2@90.95,3.45 91.219,3.45 ccw(c91.217,3.9) 91.637,3.738 cw(c92.525,3.4) 92.879,4.282 ccw(c93.045,4.7) 93.043,4.25 93.606,4.25 ccw(c93.604,4.7) 93.989,4.467 J2.17
I2C1_SCL: J5.7 R10.2 | length 4.4
  Top Layer w0.254: v1(101.8,56.1) 101.887,56.1 104.918,59.132
I2C1_SDA: J5.8 R9.2 | length 3.8
  Top Layer w0.254: v1(101.8,57) 102.119,57.319 102.401,57.319 103.448,58.366 104.567,59.485
LED: R21.1 | length 5.8
  Top Layer w0.3: 99.547,60.899 100.007,60.44 100.066,60.38 ccw(c100.277,60.593) 100.277,60.293 100.435,60.293 ccw(c100.433,60.593) 100.627,60.364 100.683,60.412 ccw(c100.36,60.793) 100.856,60.731 100.898,61.061 ccw(c100.6,61.098) 100.9,61.098 100.9,61.597 cw(c101.2,61.596) 100.916,61.691 ccw(c100.3,61.9) 100.93,62.061 cw(c101.221,62.134) 100.929,62.205 cw(c101.888,61.966) 101.187,62.662 v1(101.325,62.8) ; v1(117.2,15.1) 117.5,15.4 117.5,16.8
LEFT_BTN: C2.1 R2.2 SW2.1 | length 7.7
  Top Layer w0.254: v1(85.25,64.5) 85.275,64.525 85.275,65.975 85.3,66 ; 85.3,66.05 85.788,66.538 85.788,66.862 85.3,67.35 85.3,67.8 86.75,69.25 ; 96.718,58.071 97.439,57.35 97.921,57.35 v1(98.221,57.05)
NetBUZZER?_2: BUZZER?.2 D17.2 Q17.3 | length 3.8
  Top Layer w0.3: Q17.3 v1(49.8,10.7) ; 82.484,60.684 D17.2
NetC22_1: C22.1 FB1.2 | length 13.6
  Top Layer w0.254: 87.8,52.8 87.85,52.85 FB1.2 88.9,54.3 90.7,56.1 93.645,56.1 cw(c93.645,55.846) 93.797,56.049 cw(c93.645,55.846) 93.824,56.026 94.922,54.928 ccw(c95.101,55.108) 94.949,54.905 ccw(c95.101,55.108) 95.101,54.854 96.034,54.854 96.401,55.222 96.401,56.267 95.658,57.01
NetC24_1: C24.1 C25.1 D18.1 R13.1 R17.1 R20.1 TP4.1 | length 11
  Top Layer w1: R17.1@4.7,8.675 R17.1@4.825,8.675 ; R17.1@4.85,8.7 R13.1 6.125,8.7 5.5,9.325
  Top Layer w1.5: C24.1 5.519,14.481 7.5,14.481 8.669,14.481 D18.1
  Top Layer w2: 5.5,9.325 5.5,10.3 5.5,12.4 C24.1
NetD18_2: D18.2 L1.2 Q18.3 | length 5.5
  Top Layer w1.5: Q18.3 12.95,17.75 D18.2
NetJ3_3: J3.3 R5.1 | length 2.2
  Top Layer w0.254: 25.85,27 25.925,27.075 25.925,29.035 J3.3
NetJ3_4: J3.4 R6.1 | length 2.2
  Top Layer w0.254: J3.4 27.075,29.035 27.075,27.075 27.15,27
NetLED1_1: LED1.1 R21.2 | length 1.3
  Top Layer w0.3: 116.55,19.3 117.45,18.4 117.5,18.4
NetQ17_1: Q17.1 R14.2 | length 4.3
  Top Layer w0.254: 88.663,48.35 89.765,49.452 91.552,49.452 91.877,49.777 91.927,49.777 92.2,50.05 92.2,50.1
NetQ18_1: Q18.1 Q19.3 R16.2 | length 5.3
  Top Layer w0.254: R16.2@17.75,14.6 17.75,14.65 17.298,15.102 17.298,16.67 17.648,17.02 Q18.1 17.87,17 Q19.3@20.15,17
NetQ19_1: Q19.1 R15.2 R19.2 | length 2.6
  Top Layer w0.254: 22.15,14.6 22.75,14.6 ; Q19.1 22.75,14.6 ; 23.35,14.6 22.75,14.6
RAW_GND: C5.2 C6.2 C7.2 J3.1 J3.6 J3.7 J3.8 J3.9 J3.10 R5.2 R6.2 U9.2
  other v1: 23.514,34.277 24.107,34.288 24.707,34.288 25.307,34.288 25.9,34.3 26.5,34.3 27.107,34.288 27.7,34.3 28.3,34.3 28.907,34.288 29.5,34.3
RIGHT_BTN: C4.1 R4.2 SW4.1 | length 4.9
  Top Layer w0.254: 104.3,66 v1(104.3,66.7) 104.3,67.8 105.75,69.25
  Top Layer w0.3: v1(96.672,59.531) 97.426,58.778
RST: C23.1 R11.2 | length 6.7
  Top Layer w0.3: 52.7,12.4 v1(52.7,13.05) 52.7,13.7 ; 97.779,59.132 98.411,58.5 98.619,58.5 98.794,58.326 98.81,58.31 cw(c98.35,57.85) 98.992,57.747 98.863,56.947 cw(c98.221,57.05) 98.819,56.795 98.789,56.726 cw(c98.514,56.844) 98.726,56.631 98.04,55.945 v1(98.04,54.685)
SWCLK: J5.11
SWDIO: J5.10
TIM16_CH1: R14.1 | length 3.1
  Top Layer w0.254: 93.8,50.1 94.325,50.1 94.648,50.423 95.505,50.423 96.365,51.283
TIM17_CH1: R19.1 | length 3.1
  Top Layer w0.254: 94.321,49.166 95.114,49.96 95.749,49.96 96.718,50.929
  other v1: 94,49.1
USART1_RX: J5.2
USART1_TX: J5.3
VBAT: BAT1.1 C14.1 | length 3.8
  Top Layer w0.3: 99.9,61.253 99.441,61.713 99.362,61.791 cw(c99.575,62.003) 99.275,62.003 99.275,62.775 99.634,63.134 99.67,63.099 99.67,62.53 v1(100.3,61.9)
VBUS: C5.1 C6.1 C7.1 J3.2 J3.5 TP1.1 U9.1
VCC_3V3: C12.1 C13.1 C19.1 C20.1 C21.1 FB1.1 J5.9 R1.1 R2.1 R3.1 R4.1 R8.1 R9.1 R10.1 R11.1 R12.1 TP3.1 U10.5
VCC_5V0: BUZZER?.1 C8.1 C9.1 C10.1 C11.1 D17.1 J4.3 J5.1 J5.5 L1.1 R7.1 R15.1 R16.1 TP2.1 U9.6 U10.1 U10.3
VCC_HV: R13.2
pads on no net: BUZZER?.3 BUZZER?.4 H1.1 H2.1 H3.1 H4.1 H5.1 H6.1 J1.1 J1.3 J1.5 J1.7 J1.9 J1.11 J1.13 J1.15 U10.4 U?.1 U?.2 U?.3 U?.4 U?.5 U?.6 U?.7 U?.8 U?.9 U?.10 U?.11 U?.12 U?.13 U?.14 U?.15 U?.16
copper on no net:
  other v2: 3,1 50,1 97,1 1.6,1.6 4.4,1.6 48.6,1.6 51.4,1.6 95.6,1.6 98.4,1.6 1,3 5,3 48,3 52,3 95,3 99,3 1.6,4.4 4.5,4.4 48.6,4.4 51.5,4.4 95.6,4.4 98.5,4.4 3,5 50,5 97,5 3,30 50,30 97,30 1.6,30.6 4.4,30.6 48.6,30.6 51.4,30.6 95.6,30.6 98.4,30.6 1,32 5,32 48,32 52,32 95,32 99,32 1.6,33.4 4.5,33.4 48.6,33.4 51.5,33.4 95.6,33.4 98.5,33.4 3,34 50,34 97,34

## Polygon pours and split planes (outlines as drawn)
VCC_5V0 on Top Layer "NONET_L01_P-001" (solid, shelved, pour order 15): 8.75,34 9.751,35.001 15.249,35.001 16.25,34 16.25,27.1 18.65,24.7 24.85,24.7 25.85,25.7 27.55,25.7 27.75,25.5 27.75,21 26.75,20 15.75,20 8.75,27
RAW_GND on Top Layer "NONET_L01_P-001" (solid, shelved, pour order 16): 26.409,27.8 24.57,26.075 19.126,26.124 17.25,28 17.25,35 30.75,35 31.75,34 31.75,27.8
NetD18_2 on Top Layer "NONET_L01_P-001" (solid, shelved, pour order 18): 5.75,34.5 6.25,34 6.25,26 9.25,23 9.25,16.5 1.75,16.5 1.75,34 2.25,34.5
GND on Top Layer "Top Layer-No Net" (solid, shelved, pour order 19): 11.5,10 43.5,10 44.5,9 44.5,0 81.5,0 81.5,31 82.5,32 100,32 100,35 36.5,35 36.5,28 37.5,28 41.5,24 41.5,20.5 40.5,19.5 33.5,19.5 32.5,20.5 32.5,24.7 31.5,25.7 28.25,25.7 27.9,25.467 27.9,22.9 10.8,22.9 10.8,11.8 12.3,11.8 11.5,11
VCC_5V0 on Bottom Layer "NONET_L01_P-001" (solid, shelved, pour order 14): 8.75,34 9.751,35.001 15.249,35.001 16.25,34 16.25,23.1 12.65,23.1 8.75,27
RAW_GND on Bottom Layer "NONET_L01_P-001" (solid, shelved, pour order 17): 26.409,27.8 24.57,26.075 19.126,26.124 17.25,28 17.25,35 30.75,35 31.75,34 31.75,27.8
GND on Bottom Layer "Bottom Layer-No Net" (solid, remove dead copper, shelved, pour order 13): 3,9.5 41.5,9.5 44.5,6.5 44.5,0 82,0 82,29 85,32 100,32 100,35 36.5,35 36.5,28 37.5,28 41.5,24 41.5,20.5 40.5,19.5 33.5,19.5 32.5,20.5 32.5,24.7 25.55,24.7 22.25,22.5 3,22.5
GND on Bottom Layer "NONET_L01_P-001" (solid, shelved, pour order 5): 80.9,1.942 82.381,3.366 82.225,27.725 84.5,30 88.5,30 90.5,28 90.5,0 80.9,0

## Keep-outs
Keep-Out Layer:
  the board outline again, w0.05

## Other copper
Bottom Layer:
  text "nexnpvnk / nexnclock one" at 35,50.227 h3
  text "20250608" at 26.673,23.583 h0.64
  text ".Pcb_File_Name_No_Path" at 26.673,22.636 h0.64

## Silkscreen, mask and mechanical layers (free items; w line width, h text height)
Top Overlay:
  lines w0.2: 108.805,27.125 108.805,33.9 ; 111.345,27.125 111.345,33.9 ; 113.885,27.125 113.885,33.9 ; 118.965,27.125 118.965,33.9 ; 121.505,27.125 121.505,33.9 ; 124.045,27.125 124.045,33.9 ; 129.125,27.125 129.125,33.9 ; 131.665,27.125 131.665,33.9 ; 134.205,27.125 134.205,33.9
  lines w0.6: 106.265,27.125 106.265,33.9 ; 116.425,27.125 116.425,33.9 ; 126.585,27.125 126.585,33.9 ; 136.745,27.125 136.745,33.9
  text "RX" at 110.472,27.361 h1.5 r90
  text "TX" at 113.072,27.363 h1.5 r90
  text "DIO" at 130.871,27.296 h1.5 r90
  text "SCL" at 123.231,27.198 h1.5 r90
  text "CLK" at 133.371,27.198 h1.5 r90
  text "3V3" at 128.371,27.133 h1.5 r90
  text "5V0" at 107.971,27.1 h1.5 r90
  text "GND" at 115.571,27.1 h1.5 r90
  text "5V0" at 118.131,27.1 h1.5 r90
  text "GND" at 120.631,27.1 h1.5 r90
  text "GND" at 135.971,27.1 h1.5 r90
  text "SDA" at 125.731,27.068 h1.5 r90
Bottom Overlay:
  drawing of 15 lines, arcs and shapes, not listed
  text "Designed by nexnpvnk in Russia / Assembled in Russia/China" at 43.054,40.769 h1.5
  text "RX" at 109.37,29.419 h2 r270
  text "TX" at 111.97,29.42 h2 r270
  text "DIO" at 129.771,29.331 h2 r270
  text "SCL" at 122.131,29.201 h2 r270
  text "CLK" at 132.271,29.2 h2 r270
  text "3V3" at 127.271,29.113 h2 r270
  text "5V0" at 106.871,29.089 h2 r270
  text "GND" at 114.471,29.069 h2 r270
  text "5V0" at 117.031,29.069 h2 r270
  text "GND" at 119.531,29.069 h2 r270
  text "GND" at 134.871,29.069 h2 r270
  text "SDA" at 124.631,29.027 h2 r270
Bottom Solder:
  text "nexnpvnk / nexnclock one" at 38,50.227 h3

## Text inside footprints (layer, text, board x,y; h text height)
BUZZER?: Top Overlay ">" at 44.841,26.183 h0.64
D1: Top Overlay ">" at 94.175,30.6 h0.5 r180
D2: Top Overlay ">" at 94.175,28.8 h0.5 r180
D3: Top Overlay ">" at 94.175,27 h0.5 r180
D4: Top Overlay ">" at 94.175,25.2 h0.5 r180
D5: Top Overlay ">" at 94.175,23.4 h0.5 r180
D6: Top Overlay ">" at 94.175,21.6 h0.5 r180
D7: Top Overlay ">" at 94.175,19.8 h0.5 r180
D8: Top Overlay ">" at 94.175,18 h0.5 r180
D9: Top Overlay ">" at 94.175,16.2 h0.5 r180
D10: Top Overlay ">" at 94.175,14.4 h0.5 r180
D11: Top Overlay ">" at 94.175,12.6 h0.5 r180
D12: Top Overlay ">" at 94.175,10.8 h0.5 r180
D13: Top Overlay ">" at 94.175,9 h0.5 r180
D14: Top Overlay ">" at 94.175,7.2 h0.5 r180
D15: Top Overlay ">" at 94.175,5.4 h0.5 r180
D16: Top Overlay ">" at 94.175,3.6 h0.5 r180
D17: Top Overlay ">" at 85.179,64.009 h0.5 r270
D18: Top Overlay ">" at 8.238,12.835 h0.5 r45
J1: Top Overlay ">" at 47.5,2.2 h1 r180
J2: Top Overlay ">" at 94.47,29.223 h1 r315
J4: Top Overlay ">" at 94.05,33.8 h1 r180
J5: Top Overlay ">" at 107.65,37.7 h1
Q1: Top Overlay ">" at 86.275,31.05 h0.5
Q2: Top Overlay ">" at 82.735,30.112 h0.5 r315
Q3: Top Overlay ">" at 86.535,28.312 h0.5 r315
Q4: Top Overlay ">" at 82.735,26.512 h0.5 r315
Q5: Top Overlay ">" at 86.535,24.712 h0.5 r315
Q6: Top Overlay ">" at 82.735,22.912 h0.5 r315
Q7: Top Overlay ">" at 86.535,21.112 h0.5 r315
Q8: Top Overlay ">" at 82.735,19.312 h0.5 r315
Q9: Top Overlay ">" at 86.535,17.512 h0.5 r315
Q10: Top Overlay ">" at 82.735,15.712 h0.5 r315
Q11: Top Overlay ">" at 86.535,13.912 h0.5 r315
Q12: Top Overlay ">" at 82.735,12.112 h0.5 r315
Q13: Top Overlay ">" at 86.535,10.312 h0.5 r315
Q14: Top Overlay ">" at 82.735,8.512 h0.5 r315
Q15: Top Overlay ">" at 86.535,6.712 h0.5 r315
Q16: Top Overlay ">" at 82.735,4.912 h0.5 r315
Q17: Top Overlay ">" at 52.225,9.95 h0.5 r180
Q19: Top Overlay ">" at 23.875,16.35 h0.5 r180
U9: Top Overlay ">" at 42.073,27.53 h1 r225
U10: Top Overlay ">" at 44.175,13.925 h0.5
U?: Top Overlay ">" at 55.035,14.607 h0.5 r315
U?: Top Overlay ">" at 71.035,16.107 h0.5 r315
U?: Top Overlay ">" at 71.035,27.607 h0.5 r315
Y2: Top Overlay ">" at 92.17,64.423 h1 r315
ZD1: Top Overlay ">" at 91.725,1.75 h0.5 r180